# Altium PCB DC_DC_BOOST_CONVERTER_SOLAR.PcbDoc
Units mm, origin at the board's own origin, x right, y up, seen from the top; angles counter-clockwise.
Board outline 280.2 x 100.2 mm, 2 copper layers (Top Layer, Bottom Layer), stack 2.071 mm thick; 104 components, 67 nets, 258 pads, 70 vias.
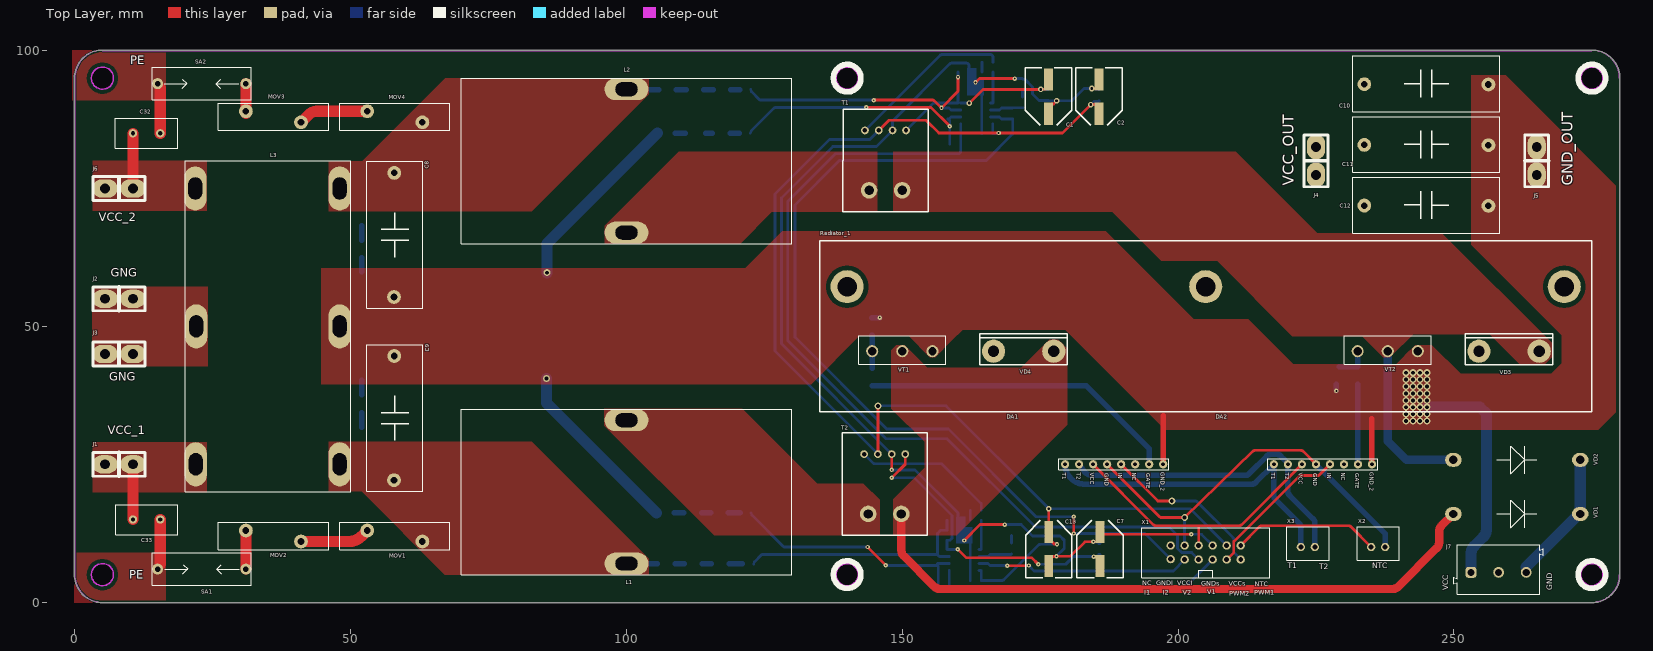
[diagram p0: Top Layer view]
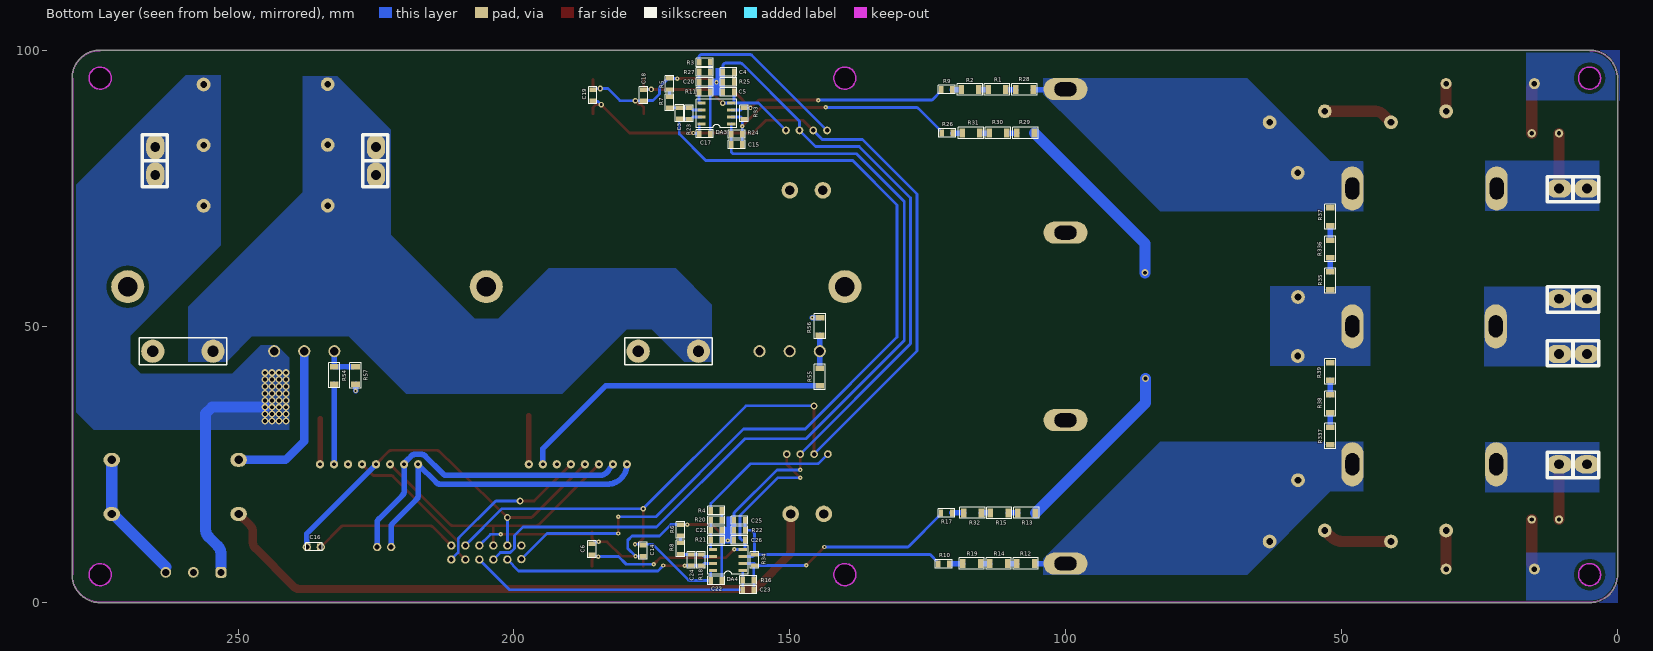
[diagram p1: Bottom Layer view, seen from below]
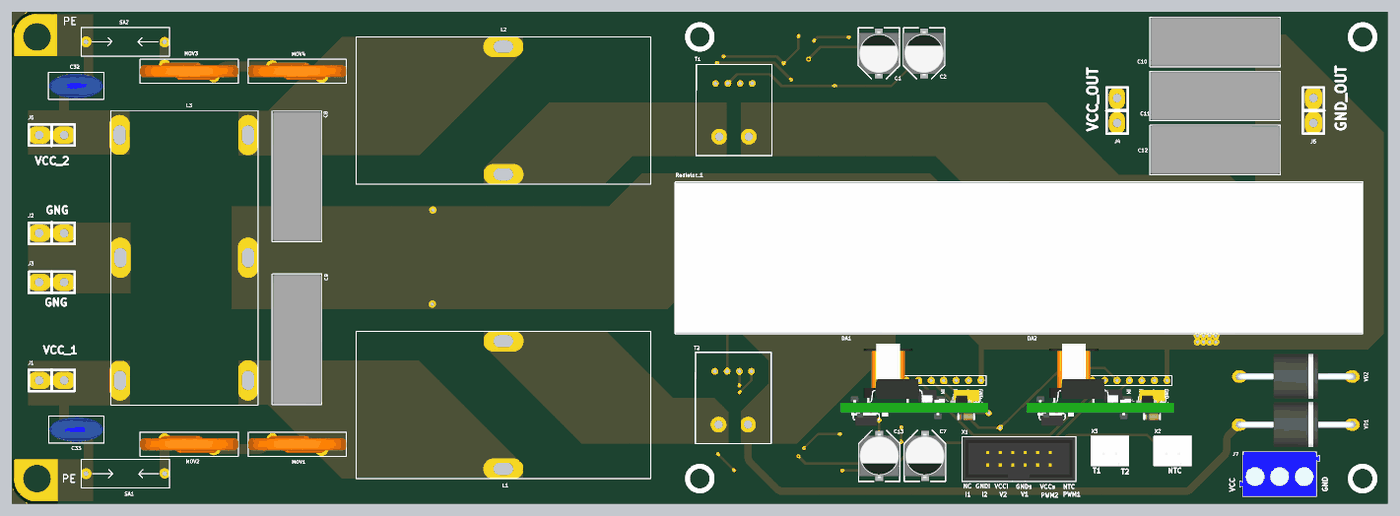
[diagram p2: 3D render of the assembled board from above, using the file's embedded part models]
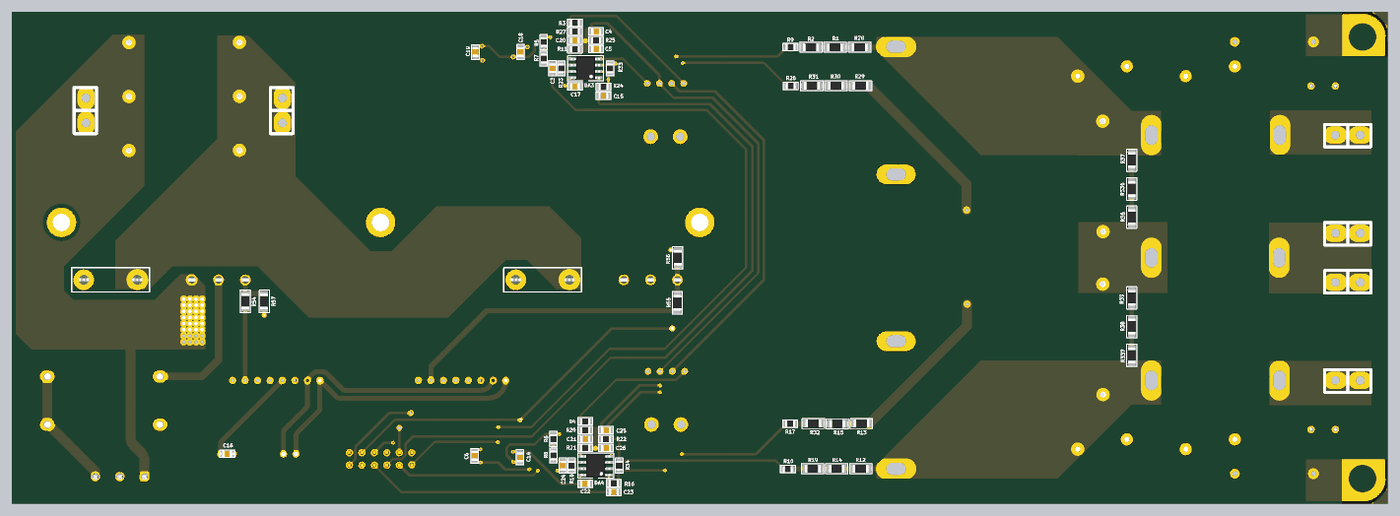
[diagram p3: 3D render of the assembled board from below, using the file's embedded part models]

## Layer stack, top to bottom
Top Solder: solder mask 0.0102, Solder Resist, Dk 3.5
Top Layer: signal copper 0.0356
Dielectric 1: dielectric 2, FR-4, Dk 4.8
Bottom Layer: signal copper 0.0356
Bottom Solder: solder mask 0.0102, Solder Resist, Dk 3.5

## Board outline
4.621,-0.086 cw(c5,5) -0.1,5 -0.1,5.001 -0.1,95 -0.1,95.001 cw(c5,95) 5,100.1 275,100.1 cw(c275,95) 280.1,95 280.1,94.999 280.1,5 280.1,4.999 cw(c275,5) 275,-0.1 274.983,-0.099
cut-out: 5,93 cw(c5,95) 3,95 cw(c5,95) 5,97 cw(c5,95) 7,95 cw(c5,95)
cut-out: 5,3 cw(c5,5) 3,5 cw(c5,5) 5,7 cw(c5,5) 7,5 cw(c5,5)
cut-out: 138,5 ccw(c140,5) 140,3 ccw(c140,5) 142,5 ccw(c140,5) 140,7 ccw(c140,5)
cut-out: 140,93 cw(c140,95) 138,95 cw(c140,95) 140,97 cw(c140,95) 142,95 cw(c140,95)
cut-out: 273,95 ccw(c275,95) 275,93 ccw(c275,95) 277,95 ccw(c275,95) 275,97 ccw(c275,95)
cut-out: 273,5 ccw(c275,5) 275,3 ccw(c275,5) 277,5 ccw(c275,5) 275,7 ccw(c275,5)

## Design rules (kind name [scope] priority, off if disabled: settings)
Clearance [All] p1: gap=0.8 ignorepadtopadclearanceinfootprint=TRUE except(0: Via-Hole Fill-Hole Text-Hole; 0.2: Arc-Track Arc-SMDPad Arc-THPad Arc-Via Arc-Fill Arc-Poly Arc-Region Arc-Text Arc-Hole; 0.25: Track-Track Track-SMDPad Track-THPad Track-Via Track-Fill Track-Poly Track-Region Track-Text Track-Hole; 0.254: Via-Via Via-Fill Via-Poly Via-Region Via-Text Fill-Fill Fill-Poly Fill-Region Fill-Text Text-Text; 0.4: Arc-Arc SMDPad-SMDPad SMDPad-THPad SMDPad-Via SMDPad-Fill SMDPad-Poly SMDPad-Region SMDPad-Text SMDPad-Hole)
ComponentClearance [All] p1: gap=-5 collisioncheckmode=3 verticalgap=0.254 showdistances=FALSE
DiffPairsRouting [All] p1: maxlimit=5 minlimit=0.254 mostfreqgap=0.254 toplayer_minwidth=0.381 toplayer_maxwidth=0.381 toplayer_prefwidth=0.381 bottomlayer_minwidth=0.381 bottomlayer_maxwidth=0.381 bottomlayer_prefwidth=0.381 maxuncoupledlength=12.7
Height [All] p1: minheight=0 maxheight=150 prefheight=50
MinimumSolderMaskSliver [All] p1: minsoldermaskwidth=0.15
PlaneClearance [All] p1: clearance=0.7
PlaneConnect [All] p1: planeconnectstyle=Direct reliefexpansion=0.508 reliefentries=4 reliefconductorwidth=0.254 reliefairgap=0.5
PolygonConnect [All] p1: connectstyle=Relief reliefconductorwidth=0.2 reliefentries=4 polygonreliefangle="90 Angle" airgapwidth=0.2
RoutingVias [All] p1: holewidth=0.711 width=1.27 viastyle="Through Hole" minholewidth=0.711 minwidth=1.27 maxholewidth=0.711 maxwidth=1.27
SilkToSilkClearance [All] p1: silktosilkclearance=0.15
SilkToSolderMaskClearance [IsPad] p1: minsilkscreentomaskgap=0.15 clearancetoexposedcopper=TRUE
SolderMaskExpansion [All] p1: expansion=0.102 istentingtop=FALSE
Width [All] p1: maxlimit=7 minlimit=0.254 preferedwidth=2 minimp=50.000000 maximp=50.000000 favimp=50.000000
22 further rules are at their usual default settings.

## Components (designator, comment, footprint, x,y, rotation, side; value= is the part's Value field where it differs from the comment)
C1 "22uF 50V" CAPPOL_SMD_SIZE_E 176.475,91.65 r90 top locked
C2 "22uF 50V" CAPPOL_SMD_SIZE_E 185.675,91.65 r90 top locked
C3 "" CAP-0805 170,88.625 r270 bottom
C4 "" CAP-0805 161.1,96.125 r180 bottom
C5 "" CAP-0805 161.1,92.525 r0 bottom
C6 "" CAP-0805 185.85,9.625 r270 bottom
C7 "22uF 50V" CAPPOL_SMD_SIZE_E 185.85,9.625 r270 top locked
C8 "470nF 630V" CAP-FILM-22.5X26.5X10 58,66.575 r90 top
C9 "470nF 630V" CAP-FILM-22.5X26.5X10 58,33.375 r90 top
C10 "470nF 630V" CAP-FILM-22.5X26.5X10 245,94 r180 top
C11 "470nF 630V" CAP-FILM-22.5X26.5X10 245,83 r180 top
C12 "470nF 630V" CAP-FILM-22.5X26.5X10 245,72 r180 top locked
C13 "22uF 50V" CAPPOL_SMD_SIZE_E 176.55,9.625 r270 top
C14 "" CAP-0805 176.625,9.35 r270 bottom
C15 "" CAP-0805 159.6,83 r180 bottom
C16 "100nF" CAP-0805 236.25,10.05 r0 bottom
C17 "" CAP-0805 165.4,84.925 r180 bottom
C18 "" CAP-0805 176.5,91.925 r90 bottom
C19 "" CAP-0805 185.7,91.9 r90 bottom
C20 "" CAP-0805 165.425,94.3 r0 bottom
C21 "" CAP-0805 163.3,13.05 r0 bottom
C22 "" CAP-0805 163.325,3.95 r180 bottom
C23 "" CAP-0805 157.5,2.25 r180 bottom
C24 "" CAP-0805 167.85,7.65 r270 bottom
C25 "" CAP-0805 159.1,14.85 r180 bottom
C26 "" CAP-0805 159.1,11.25 r0 bottom
C32 "" CAP-V 13,85 r0 top locked
C33 "" CAP-V 13,15 r180 top locked
DA1 "DRIVER_GATE_BOARD_solar_boost_converter" DRIVER_GATE_BOARD_solar_boost_converter 197.29,25 r180 top
DA2 "DRIVER_GATE_BOARD_solar_boost_converter" DRIVER_GATE_BOARD_solar_boost_converter 235.14,25 r180 top locked
DA3 "LM358" SOIC8-150 163.275,88.6 r0 bottom
DA4 "LM358" SOIC8-150 161.2,7.65 r0 bottom
J1 "" Klema_PCB_15A 8,25 r0 top
J2 "" Klema_PCB_15A 8,55 r0 top
J3 "" Klema_PCB_15A 8,45 r180 top
J4 "" Klema_PCB_15A 225,80 r90 top
J5 "" Klema_PCB_15A 265,80 r90 top
J6 "" Klema_PCB_15A 8,75 r0 top
J7 "691101710003" 691101710003 258.1,5.9 r0 top
L1 "1,5mH" DROSSEL_TOR_50X30X20 100,20 r180 top locked
L2 "1,5mH" DROSSEL_TOR_50X30X20 100,80 r0 top locked
L3 "2.2mH" DROSSEL_TOR_50X30X20X3 35,50 r90 top locked
MOV1 "750V" VARISTOR_20MM 58,12 r180 top locked
MOV2 "750V" VARISTOR_20MM 36,12 r180 top locked
MOV3 "750V" VARISTOR_20MM 36,88 r0 top locked
MOV4 "750V" VARISTOR_20MM 58,88 r0 top
R1 "1M" RES-1206 112.425,92.925 r0 bottom
R2 "1M" RES-1206 117.325,92.925 r0 bottom
R3 "2K" RES-0805 165.425,97.875 r180 bottom
R4 "2K" RES-0805 163.3,16.65 r180 bottom
R5 "2K" RES-0805 171.775,93.95 r270 bottom
R6 "2K" RES-0805 169.8,13.075 r270 bottom
R7 "10K" RES-0805 171.775,90.6 r270 bottom
R8 "10K" RES-0805 169.775,9.725 r270 bottom
R9 "15K" RES-0805 121.525,92.925 r180 bottom
R10 "15K" RES-0805 122.05,6.925 r180 bottom
R11 "5K1" RES-0805 165.425,92.5 r0 bottom
R12 "1M" RES-1206 107.2,7 r0 bottom
R13 "1M" RES-1206 107.075,16.2 r0 bottom
R14 "1M" RES-1206 112.1,7 r0 bottom
R15 "1M" RES-1206 112,16.175 r0 bottom
R16 "15K" RES-0805 157.5,4.05 r0 bottom
R17 "15K" RES-0805 121.575,16.175 r180 bottom
R18 "5K1" RES-0805 166.1,7.65 r90 bottom
R19 "1M" RES-1206 117,7 r0 bottom
R20 "10K" RES-0805 163.3,14.85 r0 bottom
R21 "5K1" RES-0805 163.3,11.25 r0 bottom
R22 "15K" RES-0805 159.1,13.05 r0 bottom
R23 "5K1" RES-0805 168.225,88.6 r90 bottom
R24 "15K" RES-0805 159.6,84.825 r0 bottom
R25 "15K" RES-0805 161.1,94.3 r0 bottom
R26 "15K" RES-0805 121.45,85.025 r180 bottom
R27 "10K" RES-0805 165.425,96.1 r0 bottom
R28 "1M" RES-1206 107.425,92.925 r0 bottom
R29 "1M" RES-1206 107.25,85.05 r0 bottom
R30 "1M" RES-1206 112.25,85.05 r0 bottom
R31 "1M" RES-1206 117.15,85.05 r0 bottom
R32 "1M" RES-1206 116.85,16.2 r0 bottom
R33 "15K" RES-0805 158.25,88.6 r270 bottom
R34 "15K" RES-0805 156.4,7.65 r270 bottom
R35 "220K" RES-1206 52,58.275 r270 bottom locked
R37 "220K" RES-1206 52,69.875 r270 bottom locked
R38 "220K" RES-1206 52,35.975 r270 bottom locked
R39 "220K" RES-1206 52,41.825 r90 bottom
R54 "47" RES-1206 232.55,41.125 r270 bottom
R55 "47" RES-1206 144.55,40.825 r270 bottom
R56 "2K" RES-1206 144.5,50 r90 bottom
R57 "2K" RES-1206 228.7,41.1 r90 bottom
R336 "220K" RES-1206 52,64.025 r90 bottom locked
R337 "220K" RES-1206 52,30.125 r90 bottom
Radiator_1 "Radiator_X2" Radiator_X2 205,50 r0 top locked
SA1 "600V" SPARK_GAP 23,6 r180 top locked
SA2 "600V" SPARK_GAP 23,94 r0 top locked
T1 "STB-HAA20" STB-HAA20 146.975,80.1 r270 top locked
T2 "STB-HAA20" STB-HAA20 146.825,21.425 r270 top locked
VD1 "DIODE" DIODE_R6 261.4,16 r0 top locked
VD2 "DIODE" DIODE_R6 261.4,25.8 r0 top locked
VD3 "RHRG75120" TO-247-2 260,45.5 r0 top locked
VD4 "RHRG75120" TO-247-2 172,45.5 r0 top locked
VT1 "70N65F" TO-247-3 150,45.5 r0 top locked
VT2 "70N65F" TO-247-3 238,45.5 r0 top locked
X1 "CONN_IDC_12_PIN2.54" CONN_IDC_12_PIN2.54 205,9 r180 top locked
X2 "CONN-2-PIN" XH2- 235,10 r0 top locked
X3 "CONN-2-PIN" XH2- 222.235,10 r0 top locked

## Footprints (in the part's own frame and the unit in brackets; to place one, negate y for a bottom-side part, rotate by r counter-clockwise, add the part's x,y. Pads: shape width x height; smd on the part's side, far side on the other; paste and mask are expansions set on the pad)
691101710003 [mm] "5,00mm - modular - blue - Horizontal entry with pressure clamp - 12,6mm height - 03p"
  rrect50% 1.95x1.95 hole 1.3: 1(-5,-0.5)
  round 1.95 hole 1.3: 2(0,-0.5) 3(5,-0.5)
  silkscreen extent -8.1,-4.5 8.1,4.5, body extent -8.1,-4.5 8.1,4.5, height 12.65
CAP-0805 [mm]
  rect 0.8x1.25 smd mask+0.015: 1(-1,0) 2(1,0)
  silkscreen extent -1.52,-0.76 1.52,0.76, body extent -1,-0.62 1,0.63, height 0.8
CAP-FILM-22.5X26.5X10 [mm]
  round 2.5 hole 1.2: 1(-11.25,0.15) 2(11.25,0.1)
  silkscreen extent -13.28,-5.02 13.33,5.1, body extent -13.25,-5 13.25,5, height 18.5
CAP-V [mil]
  round 60 hole 30: 1(-97.44,0) 2(97.44,0)
  silkscreen extent -222,-106 221,108, body extent -216,-98 216,98, height 610
CAPPOL_SMD_SIZE_E [mm]
  rect 4x1.6 smd: 1(-3.1,0) 2(3.1,0)
  silkscreen extent -5.2,-4.2 5.2,4.2, body extent -4.5,-4.15 4.5,4.15, height 6.2
CONN_IDC_12_PIN2.54 [mm]
  round 1.5 hole 0.9: 1(-6.35,1.27) 2(-3.81,1.27) 3(-1.27,1.27) 4(1.27,1.27) 5(3.81,1.27) 6(6.35,1.193) 7(-6.35,-1.27) 8(-3.81,-1.27) 9(-1.27,-1.27) 10(1.27,-1.27) 11(3.81,-1.27) 12(6.35,-1.27)
  silkscreen extent -11.63,-4.52 11.63,4.57, body extent -11.52,-4.43 11.52,4.47, height 9.2
DIODE_R6 [mm]
  oval 3x2.5 hole 1.5: 1(11.5,0) 2(-11.5,0)
  silkscreen extent -3.6,-2.5 3.6,2.5, body extent -12.08,-4.56 12.08,4.56, height 10.56
DRIVER_GATE_BOARD_solar_boost_converter [mm]
  round 1.5 hole 0.7: 1(17.78,0) 2(15.24,0) 3(12.7,0) 4(10.16,0) 5(7.62,0) 6(5.08,0) 7(2.54,0) 8(0,0)
  silkscreen extent -1.02,-1 18.9,1, body extent -1.4,-7.5 28.6,9.24, height 35
DROSSEL_TOR_50X30X20 [mm]
  oval 8x4 hole 2.5 slot 4 at 0 deg: 1(0,13) 2(0,-13)
  silkscreen extent -30,-15 30,15, body extent -30,-15 30,15, height 61.25
DROSSEL_TOR_50X30X20X3 [mm]
  oval 8x4 hole 2.5 slot 4 at 0 deg: 1(-25,13.088) 2(-25,-13) 3(0,13) 4(0,-13) 5(25,13.166) 6(25,-13)
  silkscreen extent -30,-15 30,15, body extent -30,-15 30,15, height 61.25
Klema_PCB_15A [mil]
  oval 180x130 hole 70: 1(-100,0) 1(100,0)
  silkscreen extent -185,-85 185,85, body extent -161,-16 161,16, height 505
Radiator_X2 [mm]
  round 6 hole 3.5 mask+0.1: 1(-65,7.2) 1(65,7.2)
  round 6 hole 3.5: 1(0,7.2)
  silkscreen extent -70,-15.5 70,15.5, body extent -70,-15.34 70,15.35, height 70
RES-0805 [mm]
  rect 0.8x1.25 smd mask+0.015: 1(-1,0) 2(1,0)
  silkscreen extent -1.52,-0.76 1.52,0.76, body extent -1,-0.62 1,0.63, height 0.6
RES-1206 [mm]
  rect 1x1.6 smd: 1(-1.6,0) 2(1.6,0)
  silkscreen extent -2.29,-1.02 2.29,1.02, body extent -1.6,-0.8 1.6,0.8, height 0.6
SOIC8-150 [mm]
  rect 1.5x0.6 smd: 1(-2.7,1.905) 2(-2.7,0.635) 3(-2.7,-0.635) 4(-2.7,-1.905) 5(2.7,-1.905) 6(2.7,-0.635) 7(2.7,0.635) 8(2.7,1.905)
  silkscreen extent -3.65,-2.55 3.65,2.55, body extent -3,-2.45 3,2.45, height 1.75
SPARK_GAP [mm]
  round 2 hole 1: 1(-8,0) 2(8,0)
  silkscreen extent -9,-2.93 9,2.95
STB-HAA20 [mm]
  round 1.4 hole 0.8: 1(-5.425,3.7) 2(-5.425,1.25) 3(-5.425,-1.25) 4(-5.425,-3.75)
  round 3 hole 1.7: 5(5.425,-3) 6(5.425,3)
  silkscreen extent -9.3,-7.74 9.3,7.7, body extent -9.3,-7.72 9.3,7.72, height 21
TO-247-2 [mm]
  round 4.2 hole 2.032: 1(-5.461,0) 3(5.461,0)
  silkscreen extent -7.94,-2.48 7.94,3.17, body extent -7.9,-2.3 7.9,2.71, height 26.1
TO-247-3 [mm]
  round 2.2 hole 1.5: 1(-5.46,0) 2(0,0) 3(5.46,0)
  silkscreen extent -7.9,-2.4 7.9,2.8, body extent -7.75,-2.28 7.75,2.72, height 25.57
VARISTOR_20MM [mm]
  round 2.5 hole 1.2: 1(-5,1) 2(5,-1)
  silkscreen extent -10,-2.45 10,2.45, body extent -10,-1.75 10,1.75, height 28.74
XH2- [mm]
  round 1.5 hole 0.9: 1(0,0) 2(2.54,0)
  silkscreen extent -2.5,-2.35 5.13,3.65, body extent -2.4,-2.25 5,3.55, height 7

## Part data
C1 C2 C7 C13: library part CAP-POLAR
C3 C4 C5 C6 C8 C9 C10 C11 C12 C14 C15 C16 C17 C18 C19 C20 C21 C22 C23 C24 C25 C26: library part CAP-NON-POLAR
C32 C33: library part CAP-V
J1 J2 J3 J4 J5 J6: library part Klema_15_A
J7: "WR-TBL Series 101 Horizontal Entry Modular, THT, pitch 5mm, 3p", Manufacturer="Wurth Elektronik", Operating Temperature Max=105°C, Operating Temperature Min=-40°C, Rated Current=16A, Working Voltage=250V, Application="Pressure Clamp", Category="Terminal Blocks", ComponentLink1Description="Website Link", ComponentLink1URL=https://www.we-online.com/redexpert/article/691101710003?ad, ComponentLink2Description="Datasheet Link", ComponentLink2URL=https://www.we-online.com/redexpert/spec/691101710003?ad, Manufacturer Part Number=691101710003, Match Code=WR-TBL, Modularity=Yes, Mount="Through Hole", Number of Pins=3, Number of Rows=1, Orientation=Horizontal, Packaging=Box, Pitch=5mm
L1 L2 L3: library part IND-CONST
MOV1 MOV2 MOV3 MOV4: library part VARISTOR
R1 R2 R3 R4 R5 R6 R7 R8 R9 R10 R11 R12 R13 R14 R15 R16 R17 R18 R19 R20 R21 R22 R23 R24 R25 R26 R27 R28 R29 R30 R31 R32 R33 R34 R35 R37 R38 R39 R54 R55 R56 R57 R336 R337: library part RES-CONST
SA1 SA2: library part SPARK_GAP
VD3 VD4: library part MUR4060
VT1 VT2: library part IGBT-N-GCE

## Via types
v1: diameter 1.27, hole 0.711, Top Layer to Bottom Layer, 36 vias
v2: diameter 0.8, hole 0.3, Top Layer to Bottom Layer, 27 vias
v3: diameter 1, hole 0.5, Top Layer to Bottom Layer, 6 vias
v4: diameter 1.2, hole 0.711, Top Layer to Bottom Layer, 1 vias

## Nets (pads, with @x,y where several pads share a name; then routed paths per layer and width w, separated by ;. In a path a pad name is that pad's centre, name@x,y a point inside that pad or via, vN(x,y) a via of type N, cw(c..) or ccw(c..) an arc to the next point about the centre after c; other vN are vias at no path point)
G_1: DA1.7 R55.2 | length 57.8
  Bottom Layer w1: R55.2 183.375,39.225 194.75,27.85 DA1.7
G_2: DA2.7 R54.2 | length 14.6
  Bottom Layer w1: R54.2 232.6,39.525 DA2.7
GND: C8.1 C9.2 C10.1 C11.1 C12.1 DA1.8 DA2.8 J5.1 J7.1 L3.4 R13.1 R29.1 R35.2 R39.2 R56.2 R57.1 VT1.3 VT2.3 | length 125.9
  Top Layer w1: DA1.8 197.29,33.813 ; DA2.8 235.14,33.24
  Bottom Layer w1: R56.2 v2(145.9,51.6) ; v2(228.7,38.3) R57.1
  Bottom Layer w2: v1(85.525,40.55) 85.525,36.15 R13.1 ; v1(85.625,59.725) 85.625,65.025 R29.1 ; v1(245.089,35.346) 254.728,35.346 255.9,34.174 255.9,13.228 cw(c253.9,13.228) 255.316,11.816 253.685,10.185 ccw(c255.1,8.772) 253.1,8.772 253.1,6.4
  other v1: 241.339,32.846 242.589,32.846 243.839,32.846 245.089,32.846 241.339,34.096 242.589,34.096 243.839,34.096 245.089,34.096 241.339,35.346 242.589,35.346 243.839,35.346 241.339,36.596 242.589,36.596 243.839,36.596 245.089,36.596 241.339,37.846 242.589,37.846 243.839,37.846 245.089,37.846 241.339,39.096 242.589,39.096 243.839,39.096 245.089,39.096 241.339,40.346 242.589,40.346 243.839,40.346 245.089,40.346 241.339,41.596 242.589,41.596 243.839,41.596 245.089,41.596
GND_IN: J2.1 J3.1 L3.3
GND_ISO: C16.2 DA1.4 DA2.4 X1.11 X2.2 | length 73.1
  Top Layer w0.5: DA1.4 196.634,15.496 ccw(c196.987,15.85) 196.987,15.35 v4(201.175,15.35) 213.579,27.378 ccw(c213.23,27.735) 213.58,27.379 cw(c213.934,27.025) 213.934,27.525 222.248,27.525 cw(c222.248,27.025) 222.601,27.379 DA2.4
  Bottom Layer w0.5: v4(201.175,15.35) 201.151,10.466 ccw(c201.651,10.464) X1.11
  Bottom Layer w1: DA2.4 237.54,12.44 X2.2
GND_SENS: C1.1 C2.2 C4.1 C5.2 C6.1 C7.1 C13.2 C14.2 C17.2 C18.1 C19.2 C20.1 C21.1 C22.2 C25.1 C26.2 R5.1 R6.1 R11.1 R21.1 R22.2 R25.2 T1.2 T2.2 X1.9 | length 239.7
  Top Layer w0.5: v2(148.075,23.975) T2.2 ; v2(161.22,11.182) 164.113,14.075 v2(168.6,14.075) ; v2(163.275,94.225) 163.975,94.925 v2(170.4,94.925) ; C1.1 176.475,89.75 177.025,90.3 177.432,90.3 177.975,90.843 v3(177.975,90.925) ; C13.2 176.55,7.725 C13.2@177.1,8.275 ; C13.2@177.101,8.275 177.119,8.293 177.811,8.293 177.869,8.35 180.5,8.35 183.1,10.95 v2(184.65,10.95) 184.675,10.975 185.3,10.975 185.85,11.525 C7.1 186.275,12.3 v2(202.4,12.3) ; v3(184.325,93.125) 185.125,93.125 185.675,93.675 C2.2
  Bottom Layer w0.5: v2(148.075,23.975) 152.3,23.975 159.954,16.321 cw(c159.6,15.968) 160.1,15.968 C25.1 R22.2 C26.2 ; T2.2 128.246,46.679 128.245,46.68 cw(c128.6,47.032) 128.1,47.032 128.1,73.3 137.4,82.6 145.3,82.6 T1.2 148.225,87.018 cw(c148.725,87.018) 148.371,87.371 158.579,97.579 cw(c158.932,97.225) 158.932,97.725 161.6,97.725 cw(c161.6,97.225) 162.1,97.225 C4.1 R25.2 C5.2 ; C21.1 162.325,13.025 C22.2 ; C17.2 164.4,94.275 C20.1 ; v2(168.6,14.075) R6.1 171.55,14.075 173.625,12 178.575,12 179.35,11.225 179.35,9.75 v2(177.95,8.35) C14.2 ; v2(170.4,94.925) 170.412,94.937 171.762,94.937 R5.1 171.925,94.8 172.2,94.8 173.6,93.4 173.6,92.125 174.782,90.943 176.482,90.943 C18.1 v3(177.975,90.925) 180.75,90.925 182.95,93.125 v3(184.325,93.125) 184.385,93.065 185.032,93.065 185.047,93.05 185.55,93.05 C19.2 ; v2(184.65,10.95) 184.707,10.893 185.357,10.893 185.625,10.625 C6.1 ; v2(202.4,12.3) 204.24,12.3 X1.9
I_1: L1.2 T2.5
I_2: T2.6 VD1.2 VD4.3 VT1.2 | length 117.1
  Top Layer w1.5: T2.6 149.825,9.421 ccw(c151.325,9.421) 150.263,8.362 155.787,2.838 ccw(c156.846,3.9) 156.846,2.4 238.879,2.4 ccw(c238.879,3.9) 239.938,2.838 246.882,9.782 ccw(c245.821,10.843) 247.321,10.843 247.321,12.8 cw(c248.821,12.8) 247.76,13.86 VD1.2
I_3: L2.2 T1.5
I_4: T1.6 VD2.2 VD3.3 VT2.2 | length 29.6
  Bottom Layer w1.5: VT2.2 238,29.2 241.4,25.8 VD2.2
NetC1_2: C1.2 C5.1 C18.2 DA3.4 T1.1 | length 33.3
  Top Layer w0.5: v3(162.15,90.475) 164.625,92.95 v3(175.1,92.95) 175.15,93 175.925,93 176.475,93.55 C1.2
  Bottom Layer w0.5: T1.1 155.655,90.505 DA3.4@160.1,90.505 ; DA3.4@160.1,90.53 160.1,90.555 C5.1 ; DA3.4 160.59,90.49 162.135,90.49 v3(162.15,90.475) ; v3(175.1,92.95) 175.112,92.938 176.488,92.938 C18.2
NetC3_1: C3.1 DA3.6 R7.2 R23.2 | length 6.1
  Bottom Layer w0.5: DA3.6 167.635,89.235 168,89.6 R23.2 169.975,89.6 C3.1 R7.2@171.875,89.625
NetC4_2: C4.2 DA3.3 R9.1 R25.1 R33.1 | length 48.3
  Top Layer w0.5: v2(144.825,91.025) 155.47,91.025 cw(c155.468,90.525) 155.821,90.879 155.821,90.879 v2(157.1,89.6) 159.954,92.454 ccw(c159.6,92.807) 160.1,92.807 v2(160.1,95.2)
  Bottom Layer w0.5: R9.1 122.675,92.55 124.055,91.171 ccw(c124.407,91.525) 124.408,91.025 v2(144.825,91.025) ; v2(157.1,89.6) R33.1 158.475,89.6 158.84,89.235 DA3.3 ; R25.1 v2(160.1,95.2) C4.2
NetC6_2: C6.2 C7.2 C26.1 DA4.4 T2.1 | length 58
  Top Layer w0.5: v2(148.1,22.575) 150.525,25 T2.1 ; v2(160.075,9.575) 161.575,8.075 173.45,8.075 v2(174.65,6.875) ; v2(184.675,8.275) 185.3,8.275 185.85,7.725 C7.2
  Bottom Layer w0.5: v2(148.1,22.575) 152.107,22.575 159,15.682 159,11.593 158.657,11.25 C26.1 158.1,9.605 158.15,9.555 158.16,9.565 160.065,9.565 v2(160.075,9.575) ; v2(174.65,6.875) 179.625,6.875 181.025,8.275 v2(184.675,8.275) 184.732,8.332 185.332,8.332 185.625,8.625 C6.2
NetC15_2: C15.2 DA3.2 R24.1 R26.1 R33.2 | length 46.8
  Top Layer w0.5: v2(143.475,89.7) 155.2,89.7 v2(158.625,86.275)
  Bottom Layer w0.5: R26.1 122.6,85.4 126.754,89.554 cw(c127.107,89.2) 127.107,89.7 v2(143.475,89.7) ; R33.2 R33.2@158.35,87.6 ; C15.2 R24.1 158.6,87.35 R33.2@158.35,87.6 ; DA3.2 158.84,87.965 158.475,87.6 R33.2@158.35,87.6
NetC20_2: C20.2 DA3.5 R11.2 R27.2 | length 6
  Bottom Layer w0.5: DA3.5 166.375,90.505 166.425,90.555 R11.2 C20.2 R27.2
NetC21_2: C21.2 DA4.5 R20.2 R21.2 | length 5.7
  Bottom Layer w0.5: DA4.5 164.25,9.555 164.3,9.605 R20.2
NetC23_2: C23.2 DA4.2 R16.1 R17.1 R34.2 | length 44.2
  Top Layer w0.5: v2(143.7,10) 143.719,9.986 cw(c143.419,9.586) 143.775,9.937 144.854,8.846 ; 144.855,8.845 v2(147.025,6.675)
  Bottom Layer w0.5: R17.1 122.725,15.8 128.38,10.145 ccw(c128.732,10.5) 128.73,10 v2(143.7,10) ; v2(147.025,6.675) 147.05,6.65 R34.2 ; R34.2@156.4,7.015 DA4.2 ; R34.2@156.475,6.5 156.498,6.199 cw(c156,6.16) 156.5,6.162 R16.1 C23.2
NetC24_1: C24.1 DA4.6 R8.2 R18.2 | length 6.1
  Bottom Layer w0.5: DA4.6 165.51,8.285 165.875,8.65 R18.2 C24.1 169.7,8.65 R8.2
NetC25_2: C25.2 DA4.3 R10.1 R22.1 R34.1 | length 44
  Bottom Layer w0.5: R10.1 123.176,7.3 cw(c123.55,6.968) 123.196,7.321 124.379,8.504 cw(c124.732,8.15) 124.732,8.65 R34.1 ; C25.2 R22.1 156.95,13.05 156.382,12.482 156.382,12.068 156.4,12.05 R34.1 ; DA4.3 158,8.285 156.891,8.285 cw(c156.891,8.785) 156.521,8.448 156.474,8.5 R34.1
NetMOV1_2: MOV1.2 MOV2.1 | length 12.7
  Top Layer w2: MOV2.1 49.677,11 ccw(c49.675,14.198) 51.934,11.934 MOV1.2
NetMOV2_2: MOV2.2 SA1.1 | length 7
  Top Layer w2: SA1.1 MOV2.2
NetMOV3_1: MOV3.1 SA2.2 | length 5.4
  Top Layer w2: MOV3.1@31,88.6 SA2.2
NetMOV3_2: MOV3.2 MOV4.1 | length 12.7
  Top Layer w2: MOV3.2 42.416,88.416 cw(c43.828,87) 43.828,89 MOV4.1
NetR1_1: R1.1 R28.2 | length 1.8
  Bottom Layer w1: R28.2 R1.1
NetR1_2: R1.2 R2.1 | length 1.7
  Bottom Layer w1: R1.2 R2.1
NetR2_2: R2.2 R9.2 | length 1.6
  Bottom Layer w1: R2.2 R9.2
NetR3_1: R3.1 T1.4 | length 30.1
  Bottom Layer w0.5: T1.4 156.829,99.129 cw(c157.182,98.775) 157.182,99.275 165.925,99.275 cw(c165.925,98.775) 166.425,98.776 166.425,98.25 R3.1
NetR3_2: R3.2 R27.1 | length 1.8
  Bottom Layer w0.5: R27.1 R3.2
NetR4_1: R4.1 T2.4 | length 26.1
  Bottom Layer w0.5: T2.4 144.679,25.246 144.68,25.245 ccw(c145.032,25.6) 145.032,25.1 157.075,25.1 164.3,17.875 R4.1
NetR4_2: R4.2 R20.1 | length 1.8
  Bottom Layer w0.5: R20.1 R4.2
NetR5_2: R5.2 R7.1 | length 1.3
  Bottom Layer w0.5: R7.1 R5.2
NetR6_2: R6.2 R8.1 | length 1.4
  Bottom Layer w0.5: R8.1 169.775,12.05 R6.2
NetR10_2: R10.2 R19.2 | length 2.5
  Bottom Layer w0.5: R10.2@120.975,7 R10.2
  Bottom Layer w1: R19.2 R10.2@120.975,7
NetR12_2: R12.2 R14.1 | length 1.7
  Bottom Layer w1: R12.2 R14.1
NetR13_2: R13.2 R15.1 | length 1.7
  Bottom Layer w0.5: R13.2 R13.2@108.7,16.175
  Bottom Layer w1: R13.2@108.7,16.175 R15.1
NetR14_2: R14.2 R19.1 | length 1.7
  Bottom Layer w1: R14.2 R19.1
NetR15_2: R15.2 R32.1 | length 1.7
  Bottom Layer w0.5: R15.2 R15.2@113.625,16.2
  Bottom Layer w1: R15.2@113.625,16.2 R32.1
NetR17_2: R17.2 R32.2 | length 2.1
  Bottom Layer w0.5: R32.2 R32.2@118.475,16.175
  Bottom Layer w1: R32.2@118.475,16.175 R17.2
NetR26_2: R26.2 R31.2 | length 1.7
  Bottom Layer w0.5: R31.2 R31.2@118.775,85.025
  Bottom Layer w1: R31.2@118.775,85.025 R26.2
NetR29_2: R29.2 R30.1 | length 1.8
  Bottom Layer w1: R29.2 R30.1
NetR30_2: R30.2 R31.1 | length 1.2
  Bottom Layer w1: 114.35,85.05 R31.1
NetR35_1: R35.1 R336.1 | length 2.6
  Bottom Layer w1: R35.1 R336.1
NetR37_2: R37.2 R336.2 | length 2.6
  Bottom Layer w1: R336.2 R37.2
NetR38_1: R38.1 R39.1 | length 2.6
  Bottom Layer w1: R38.1 R39.1
NetR38_2: R38.2 R337.2 | length 2.6
  Bottom Layer w1: R337.2 R38.2
NetR54_1: R54.1 R57.2 VT2.1 | length 6.1
  Bottom Layer w1: R57.2@229.184,42.725 R54.1 232.55,45.49 VT2.1
NetR55_1: R55.1 R56.1 VT1.1 | length 6
  Bottom Layer w1: R56.1 144.54,48.4 VT1.1 ; R55.1 VT1.1@144.55,45.49
  Bottom Layer w2: VT1.1 VT1.1@144.55,45.49
NTC: C16.1 X1.7 X2.1 | length 26.7
  Top Layer w0.5: X1.7 214.784,13.704 cw(c215.137,13.35) 215.137,13.85 230.943,13.85 cw(c230.943,13.35) 231.296,13.704 X2.1
OUT_I_1: C24.2 DA4.7 R18.1 X1.5 | length 38.7
  Top Layer w0.5: v2(169,6.625) 172.9,6.625 v2(172.925,6.65)
  Bottom Layer w0.5: DA4.7 165.51,7.015 165.875,6.65 R18.1 C24.2 168.975,6.65 v2(169,6.625) ; v2(172.925,6.65) 173.9,5.675 199.135,5.675 X1.5
OUT_I_2: C3.2 DA3.7 R23.1 X1.6 | length 162.3
  Top Layer w0.5: v2(181.075,12.45) v2(181.075,15.475)
  Bottom Layer w0.5: DA3.7 167.635,87.965 168,87.6 R23.1 169.975,87.6 C3.2 170,84.85 165.225,80.075 138.575,80.075 130.525,72.025 130.525,48.05 147.175,31.4 158.35,31.4 174.275,15.475 v2(181.075,15.475) ; v2(181.075,12.45) 194.007,12.45 X1.6
OUT_V1: C23.1 DA4.1 R16.2 X1.3 | length 53.5
  Bottom Layer w0.5: DA4.1 R16.2 C23.1 200.79,2.25 X1.3
OUT_V2: C15.1 DA3.1 R24.2 X1.4 | length 157.7
  Bottom Layer w0.5: DA3.1 160.575,83.025 C15.1 160.6,81.625 160.275,81.3 137.9,81.3 129.225,72.625 129.225,47.425 147.025,29.625 158.125,29.625 174.125,13.625 198.35,13.625 199.9,12.075 199.9,9.75 200.65,9 202.46,9 X1.4
PE_1: C33.1 SA1.2 | length 9.2
  Top Layer w1: SA1.2 15.183,6.183 ccw(c14.475,6.889) 15.475,6.889
  Top Layer w2: 15.475,6.889 C33.1
PE_2: C32.2 SA2.1 | length 9.2
  Top Layer w1: SA2.1 15,93.729 SA2.1@15.475,93.254
  Top Layer w2: C32.2 SA2.1@15.475,93.254
PWM_1: DA1.5 X1.1 | length 30.3
  Top Layer w0.5: DA1.5 196.32,18.35 v1(198.85,18.35)
  Bottom Layer w0.5: v1(198.85,18.35) 203.093,18.35 cw(c203.093,17.85) 203.446,18.204 209.954,11.696 cw(c209.6,11.343) 210.1,11.343 210.1,8.98 X1.1
PWM_2: DA2.5 X1.2 | length 27
  Top Layer w0.5: X1.2 210.1,9.02 210.1,11.025 221.879,22.804 cw(c222.232,22.45) 222.232,22.95 225.263,22.95 ccw(c225.263,23.45) 225.616,23.096 DA2.5
T1: DA1.1 DA2.1 X3.1 | length 58.3
  Bottom Layer w1: DA1.1 ccw(c183.12,25) 183.12,21.39 213.336,21.39 ccw(c213.336,22.39) 214.042,21.682 DA2.1 217.36,19.329 ccw(c218.36,19.329) 217.652,18.623 221.944,14.331 cw(c221.235,13.626) 222.235,13.626 X3.1
T2: DA1.2 DA2.2 X3.2 | length 57.8
  Bottom Layer w1: DA1.2 182.866,23.847 ccw(c184.502,25.004) 184.505,23 212.186,23 ccw(c212.186,24) 212.892,23.292 216.108,26.508 cw(c216.814,25.8) 216.814,26.8 217.886,26.8 cw(c217.886,25.8) 218.592,26.508 219.456,25.644 cw(c218.749,24.937) 219.565,25.515 219.716,25.302 cw(c218.9,24.724) 219.758,25.237 DA2.2 219.9,20.089 ccw(c220.9,20.089) 220.192,19.383 224.484,15.091 cw(c223.775,14.386) 224.775,14.386 X3.2@224.775,10.075
V1: C9.1 L1.1 L3.2 MOV1.1 R12.1 R337.1 | length 5.6
  Bottom Layer w1: L1.1 R12.1
V2: C8.2 L2.1 L3.6 MOV4.2 R28.1 R37.1 | length 5.9
  Bottom Layer w1: L2.1@100.075,92.925 R28.1
  Bottom Layer w2: L2.1 L2.1@100.075,92.925
VCC_IN_1: C33.2 J1.1 L3.1 | length 10
  Top Layer w1: J1.1@10.525,24.985 J1.1@10.54,25
  Top Layer w2: C33.2 J1.1@10.525,24.985
VCC_IN_2: C32.1 J6.1 L3.5 | length 10
  Top Layer w1: J6.1@10.525,75.015 J6.1@10.54,75
  Top Layer w2: J6.1@10.525,75.015 C32.1
VCC_ISO: DA1.3 DA2.3 X1.10 | length 50.5
  Top Layer w0.5: DA1.3 195.569,14.021 195.57,14.02 ccw(c195.922,14.375) 195.922,13.875 203.302,13.875 203.834,13.875 211.108,13.875 ccw(c211.108,14.375) 211.461,14.021 DA2.3 ; X1.10 203.73,13.764
VCC_OUT: C10.2 C11.2 C12.2 J4.1 VD3.1 VD4.1
VCC_OUT_2: J7.3 VD1.1 VD2.1 | length 23.6
  Bottom Layer w2: 263.1,6.4 272.7,16 VD1.1 VD2.1
VCC_SENS: C2.1 C13.1 C14.1 C17.1 C19.1 C22.1 DA3.8 DA4.8 T1.3 T2.3 X1.8 | length 237.3
  Top Layer w0.5: T2.3 v1(145.575,35.6) ; T1.3 147.575,87.375 154.3,87.375 156.625,85.05 v2(167.45,85.05) 179.022,85.05 v3(184.179,90.206) C2.1@185.125,90.206 ; v3(176.55,16.95) 176.55,11.525 177.543,10.532 177.993,10.532 v2(178.05,10.475) ; C2.1@185.503,89.828 C2.1@185.125,90.206 ; C2.1 185.675,89.656 C2.1@185.125,90.206
  Bottom Layer w0.5: T2.3 126.9,45.525 126.9,73.975 136.825,83.9 144.1,83.9 T1.3 ; v1(145.575,35.6) 157.9,35.6 v3(176.55,16.95) 202.13,16.95 X1.8 ; DA4.8 164.275,5.745 164.325,5.695 C22.1 168.093,3.95 ccw(c168.093,4.45) 168.446,4.096 174.704,10.354 cw(c175.057,10) 175.057,10.5 176.625,10.5 176.638,10.488 178.037,10.488 v2(178.05,10.475) ; DA3.8@166.4,86.75 C17.1 166.462,84.988 167.388,84.988 v2(167.45,85.05) ; v3(184.179,90.206) 184.743,90.771 185.571,90.771 C19.1
pads on no net: DA1.6 DA2.6 J7.2 Radiator_1.1 X1.12

## Polygon pours and split planes (outlines as drawn)
GND on Top Layer "GND_L01_P011" (solid, pour order 11): 44.653,60.5 44.653,39.5 126.675,39.5 126.675,60.5
I_4 on Top Layer "I_4_L01_P027" (solid, pour order 27): 267.8,46.9 247.8,66.9 224.6,66.9 224.6,57.05 233.05,48.6 256.5,48.6 261.85,43.25 266.55,43.25 267.8,44.5
GND on Top Layer "GND_L01_P029" (solid, pour order 29): 253.125,95.525 253.125,64.775 269.5,48.4 269.5,43.3 267.62,41.42 251.198,41.402 246,46.6 242.975,46.6 241.125,44.75 241.125,31.25 276.125,31.25 279.35,34.475 279.35,75.525 259.35,95.525
GND on Top Layer "GND_L01_P023" (solid, pour order 23): 117.395,56.37 128.25,67.225 186.9,67.225 202.8,51.325 212.7,51.325 220.9,43.125 239.529,43.125 241.675,45.271 242.979,46.575 245.975,46.575 245.975,31.25 197.675,31.25 179.5,49.425 160.95,49.425 159,47.475 155.959,44.434 154.97,44.434 151.129,48.275 142.225,48.275 133.45,39.5 117.395,39.5
I_2 on Top Layer "I_2_L01_P025" (solid, pour order 25): 148.325,18.65 154.025,24.35 154.025,29.075 148.025,35.075 148.025,45.7 148.925,46.6 150.45,46.6 154.55,42.5 171.525,42.5 176.625,47.6 178.275,47.6 179.9,45.975 179.9,32.15 159.85,12.1 148.325,12.1
I_4 on Top Layer "I_4_L01_P024" (solid, pour order 24): 148.337,74.692 148.337,70.767 188.053,70.767 196.919,61.9 207.081,61.9 220.731,48.25 233.344,48.25 237.219,44.375 238.403,44.375 242.775,48.747 242.775,49.369 210.444,81.7 148.337,81.7
I_1 on Top Layer "I_1_L01_P022" (solid, pour order 22): 145.91,16.639 145.91,18.539 142.948,21.5 134.55,21.5 121.025,35.025 96,35.025 96,32 115.886,12.114 145.91,12.114
I_3 on Top Layer "I_3_L01_P021" (solid, pour order 21): 145.475,74.675 145.475,70.75 126.35,70.75 120.6,65 96.03,65 96.03,68.255 109.475,81.7 145.475,81.7
V2 on Top Layer "V2_L01_P020" (solid, pour order 20): 46.08,79.928 46.089,79.937 52.055,79.937 67.117,94.999 104.069,94.999 104.069,92.102 97.98,86.012 82.859,70.891 46.08,70.891
V1 on Top Layer "V1_L01_P019" (solid, pour order 19): 46,20.085 46.01,20.075 51.975,20.075 67.051,4.999 103.989,4.999 103.989,7.911 97.9,14 82.779,29.121 46,29.121
V1 on Top Layer "V1_L01_P015" (solid, pour order 15): 46,29.121 46,20.085 63.075,20.085 63.075,29.121
V2 on Top Layer "V2_L01_P014" (solid, pour order 14): 46,79.871 46,70.835 63.056,70.835 63.056,79.871
PE_2 on Top Layer "PE_2_L01_P002" (solid, pour order 2): -0.517,100.074 -0.517,91.038 16.45,91.038 16.45,100.074
PE_1 on Top Layer "PE_1_L01_P003" (solid, pour order 3): -0.1,8.95 -0.1,-0.086 16.45,-0.086 16.45,8.95
GND_IN on Top Layer "GND_IN_L01_P009" (solid, pour order 9): 3.175,57.2 3.175,42.75 24.101,42.75 24.101,57.2
VCC_IN_1 on Top Layer "VCC_IN_1_L01_P007" (solid, pour order 7): 3.218,28.98 3.218,19.943 23.913,19.943 23.913,28.98
VCC_IN_2 on Top Layer "VCC_IN_2_L01_P006" (solid, pour order 6): 3.21,80.007 3.21,70.971 23.905,70.971 23.905,80.007
GND_SENS on Bottom Layer "GND_SENS_L02_P033" (solid, pour order 33): 159.7,13.664 159.7,10.589 162.695,10.589 162.695,13.664
GND_SENS on Bottom Layer "GND_SENS_L02_P032" (solid, pour order 32): 159.694,15.519 159.694,12.443 161.369,12.443 161.369,15.519
GND on Bottom Layer "GND_L02_P028" (solid, pour order 28): 253.125,95.525 253.125,64.675 256.55,61.25 269.5,48.3 269.5,43.3 267.62,41.42 251.098,41.402 245.9,46.6 242.975,46.6 240.7,44.325 240.7,31.25 276.125,31.25 279.35,34.475 279.35,75.65 259.475,95.525
VCC_OUT on Bottom Layer "VCC_OUT_L02_P026" (solid, pour order 26): 164.095,43.618 164.095,53.895 170.7,60.5 193.65,60.5 202.8,51.35 207.127,51.35 222.349,66.572 222.349,85.662 232.037,95.35 238.263,95.35 238.263,74.325 259.045,53.543 259.045,43.618 252.082,43.618 247.5,48.2 229.9,48.2 219.5,37.8 191.2,37.8 179.5,49.5 175.027,49.5 169.145,43.618
V2 on Bottom Layer "V2_L02_P018" (solid, pour order 18): 46,79.928 46.01,79.937 51.975,79.937 67.037,94.999 103.989,94.999 103.989,92.102 97.9,86.012 82.779,70.891 46,70.891
V1 on Bottom Layer "V1_L02_P017" (solid, pour order 17): 46,20.085 46.01,20.075 51.975,20.075 67.051,4.999 103.989,4.999 103.989,7.911 97.9,14 82.779,29.121 46,29.121
V1 on Bottom Layer "V1_L02_P012" (solid, pour order 12): 46,29.121 46,20.085 63.075,20.085 63.075,29.121
V2 on Bottom Layer "V2_L02_P013" (solid, pour order 13): 46,79.871 46,70.835 63.056,70.835 63.056,79.871
GND on Bottom Layer "GND_L02_P010" (solid, pour order 10): 44.725,57.289 44.725,42.839 62.884,42.839 62.884,57.289
GND_IN on Bottom Layer "GND_IN_L02_P008" (solid, pour order 8): 3.175,57.2 3.175,42.75 24.101,42.75 24.101,57.2
VCC_IN_1 on Bottom Layer "VCC_IN_1_L02_P004" (solid, pour order 4): 3.218,28.98 3.218,19.943 23.913,19.943 23.913,28.98
VCC_IN_2 on Bottom Layer "VCC_IN_2_L02_P005" (solid, pour order 5): 3.21,80.007 3.21,70.971 23.905,70.971 23.905,80.007
PE_1 on Bottom Layer "PE_1_L02_P000" (solid, pour order 0): -0.1,8.95 -0.1,-0.086 16.5,-0.086 16.5,8.95
PE_2 on Bottom Layer "PE_2_L02_P001" (solid, pour order 1): -0.517,100.074 -0.517,91.038 16.5,91.038 16.5,100.074
no net on Top Solder "NONET_L-01_P-001" (solid): -0.1,90.99 9.124,90.99 9.124,100.002 2.77,100.002 -0.047,97.185
no net on Top Solder "NONET_L-01_P-001" (solid): 0.009,8.925 9.232,8.925 9.232,-0.086 2.878,-0.086 0.061,2.731
no net on Bottom Solder "NONET_L-01_P-001" (solid): -0.1,90.99 9.124,90.99 9.124,100.002 2.77,100.002 -0.047,97.185
no net on Bottom Solder "NONET_L-01_P-001" (solid): 0.009,8.925 9.232,8.925 9.232,-0.086 2.878,-0.086 0.061,2.731

## Keep-outs
Keep-Out Layer:
  circle w0.254: c140,95 r2
  circle w0.254: c140,5 r2
  circle w0.254: c275,5 r2
  circle w0.254: c275,95 r2
  circle w0.254: c5,95 r2
  circle w0.254: c5,5 r2
  lines w0.2: 4.672,0 4.836,0 4.838,0.002 275,0.002 ; 5,0 cw(c5,5) 0,5 0,95 cw(c5,95) 5,100 275,100 cw(c275,95) 280,95 280,5 cw(c275,5) 275,0

## Other copper
Bottom Layer:
  rectangle net GND_SENS: 163.058,91.881 164.833,94.925
  rectangle net GND_SENS: 161.683,91.881 163.458,96.799
  rectangle net GND_SENS: 160.958,10.606 162.733,13.664
  rectangle net GND_SENS: 159.7,10.6 161.475,15.519

## Silkscreen, mask and mechanical layers (free items; w line width, h text height)
Top Overlay:
  circle w1: c140,95 r2.5
  circle w1: c140,5 r2.5
  circle w1: c275,5 r2.5
  circle w1: c275,95 r2.5
  text "PE" at 10.079,97.479 h1.52
  text "VCC_OUT" at 220.967,75.475 h2 r90
  text "GND_OUT" at 271.542,75.475 h2 r90
  text "VCC_2" at 4.296,69.019 h1.52
  text "GNG" at 6.475,58.975 h1.52
  text "GNG" at 6.226,40.177 h1.52
  text "VCC_1" at 5.927,30.464 h1.52
  text "T1" at 219.879,6.154 h1
  text "NTC" at 235.204,6.154 h1
  text "T2" at 225.629,5.929 h1
  text "PE" at 9.879,4.254 h1.52
  text "NC" at 193.454,3.079 h0.85
  text "GNDI" at 196.004,3.054 h0.85
  text "VCCI" at 199.879,3.029 h0.85
  text "GNDs" at 204.229,2.979 h0.85
  text "VCCs" at 209.154,2.954 h0.85
  text "NTC" at 213.854,2.929 h0.85
  text "VCC" at 248.946,2.154 h1 r90
  text "GND" at 267.846,2.154 h1 r90
  text "V1" at 205.254,1.404 h0.85
  text "I1" at 193.854,1.379 h0.85
  text "I2" at 197.229,1.379 h0.85
  text "PWM1" at 213.804,1.379 h0.85
  text "V2" at 200.879,1.354 h0.85
  text "PWM2" at 209.279,1.204 h0.85

## Text inside footprints (layer, text, board x,y; h text height)
DA1: Top Overlay "GATE" at 194.244,23.371 h0.7 r270; Top Overlay "NC" at 191.694,23.446 h0.7 r270; Top Overlay "GND_2" at 196.861,23.521 h0.7 r270; Top Overlay "GND" at 186.669,23.346 h0.7 r270; Top Overlay "T1" at 178.994,23.496 h0.7 r270; Top Overlay "T2" at 181.594,23.496 h0.7 r270; Top Overlay "IN" at 189.144,23.371 h0.7 r270; Top Overlay "VCC" at 184.044,23.446 h0.7 r270
DA2: Top Overlay "GATE" at 232.094,23.371 h0.7 r270; Top Overlay "NC" at 229.544,23.446 h0.7 r270; Top Overlay "GND_2" at 234.711,23.521 h0.7 r270; Top Overlay "GND" at 224.519,23.346 h0.7 r270; Top Overlay "T1" at 216.844,23.496 h0.7 r270; Top Overlay "T2" at 219.444,23.496 h0.7 r270; Top Overlay "IN" at 226.994,23.371 h0.7 r270; Top Overlay "VCC" at 221.894,23.446 h0.7 r270